# EAGLE board led_bar (EAGLE 9.6.2)
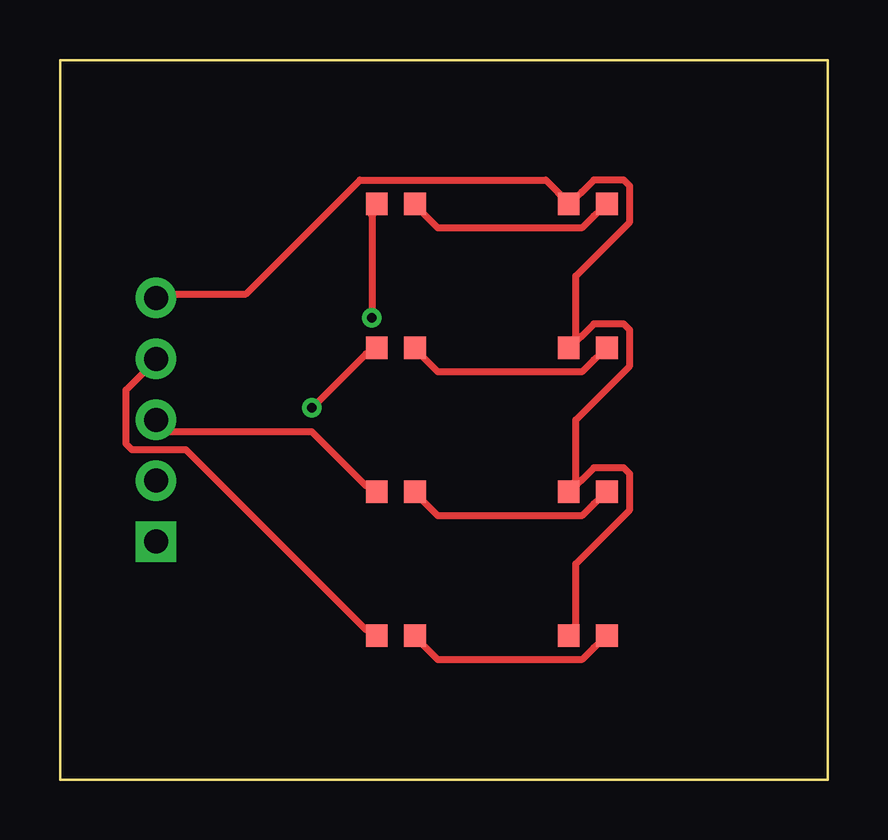
[diagram p0: board, top side]
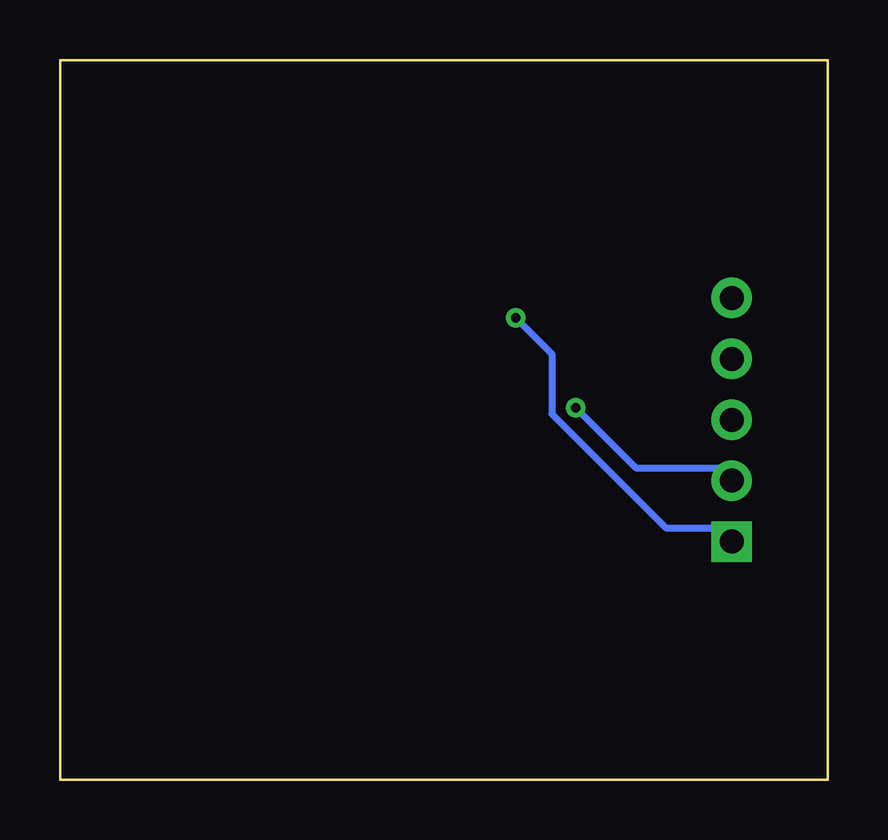
[diagram p1: board, bottom side, seen from below]

Size 32 x 30 mm. Coordinates in mm from the lower left corner, seen from the top.
Outline: 0,0 32,0 32,30 0,30 0,0
Copper layers used: Top, Bottom
Design rules "eh3d-kit": minimum track width 0.15mm, minimum drill 0.3mm, track to track 0.15mm, track to pad 0.15mm, pad to pad 0.15mm, via to via 0.15mm, smd to smd 0.15mm, copper to edge 0.3mm, drill to drill 0.25mm, minimum pad ring 0.15mm, minimum via ring 0.15mm

## Footprints (pad centres in the part's own frame; a part is rotated, then mirrored left to right if it is on the bottom)
LED-0603 = smd 0.9 x 0.95: 1 -0.8,0; 2 0.8,0
HDR-1X05 = drill 1 pad 1.7 square: 1 -5.08,0 | drill 1 pad 1.7: 2 -2.54,0; 3 0,0; 4 2.54,0; 5 5.08,0
CHIP-0603 = smd 0.9 x 0.95: 1 -0.8,0; 2 0.8,0

## Placement (x,y rotation side)
D1  RED  [LED-0603]  22,24 0 top
D2  RED  [LED-0603]  22,18 0 top
D3  RED  [LED-0603]  22,12 0 top
D4  RED  [LED-0603]  22,6 0 top
J1  LEDS  [HDR-1X05]  4,15 90 top
R1  330  [CHIP-0603]  14,24 0 top
R2  330  [CHIP-0603]  14,18 0 top
R3  330  [CHIP-0603]  14,12 0 top
R4  330  [CHIP-0603]  14,6 0 top

## Library data of the parts
D1-D4 J1 R1-R4 = eh3d-kit

## Nets
A1: D1.2 R1.2
A2: D2.2 R2.2
A3: D3.2 R3.2
A4: D4.2 R4.2
GND: D1.1 D2.1 D3.1 D4.1 J1.5
IN1: J1.1 R1.1
IN2: J1.2 R2.1
IN3: J1.3 R3.1
IN4: J1.4 R4.1

## Tracks (layer width: path | path; a pad name or v marks a point on that pad's centre or on a via)
A1
  Top 0.3: D1.2 22.25,23.5 21.75,23 15.75,23 15.25,23.5 R1.2
A2
  Top 0.3: D2.2 22.25,17.5 21.75,17 15.75,17 15.25,17.5 R2.2
A3
  Top 0.3: D3.2 22.25,11.5 21.75,11 15.75,11 15.25,11.5 R3.2
A4
  Top 0.3: D4.2 22.25,5.5 21.75,5 15.75,5 15.25,5.5 R4.2
GND
  Top 0.3: D4.1 21.5,6.5 21.5,9 23.75,11.25 23.75,12.75 23.5,13 22.25,13 21.75,12.5 D3.1 21.5,12.5 21.5,15 23.75,17.25 23.75,18.75 23.5,19 22.25,19 21.75,18.5 D2.1 21.5,18.5 21.5,21 23.75,23.25 23.75,24.75 23.5,25 22.25,25 21.75,24.5 D1.1 20.75,24.5 20.25,25 12.5,25 7.75,20.25 4.5,20.25 J1.5
IN1  (via drill 0.4 pad 0.8)
  Top 0.3: R1.1 13,23.5 v13,19.25
  Bottom 0.3: v13,19.25 11.5,17.75 11.5,15.25 6.75,10.5 4.5,10.5 J1.1
IN2  (via drill 0.4 pad 0.8)
  Top 0.3: R2.1 12.75,17.75 v10.5,15.5
  Bottom 0.3: v10.5,15.5 8,13 4.5,13 J1.2
IN3
  Top 0.3: R3.1 12.75,12.25 10.5,14.5 4.5,14.5 J1.3
IN4
  Top 0.3: R4.1 12.75,6.25 5.25,13.75 3,13.75 2.75,14 2.75,16.25 3.5,17 J1.4